# Altium PCB FOLLOWER_post_autoroute.PcbDoc
Units mm, origin at the board's own origin, x right, y up, seen from the top; angles counter-clockwise.
Board outline 51.98 x 74.98 mm, 4 copper layers (Top Layer, GND, PWR, Bottom Layer), stack 0.603 mm thick; 40 components, 49 nets, 196 pads, 39 vias.
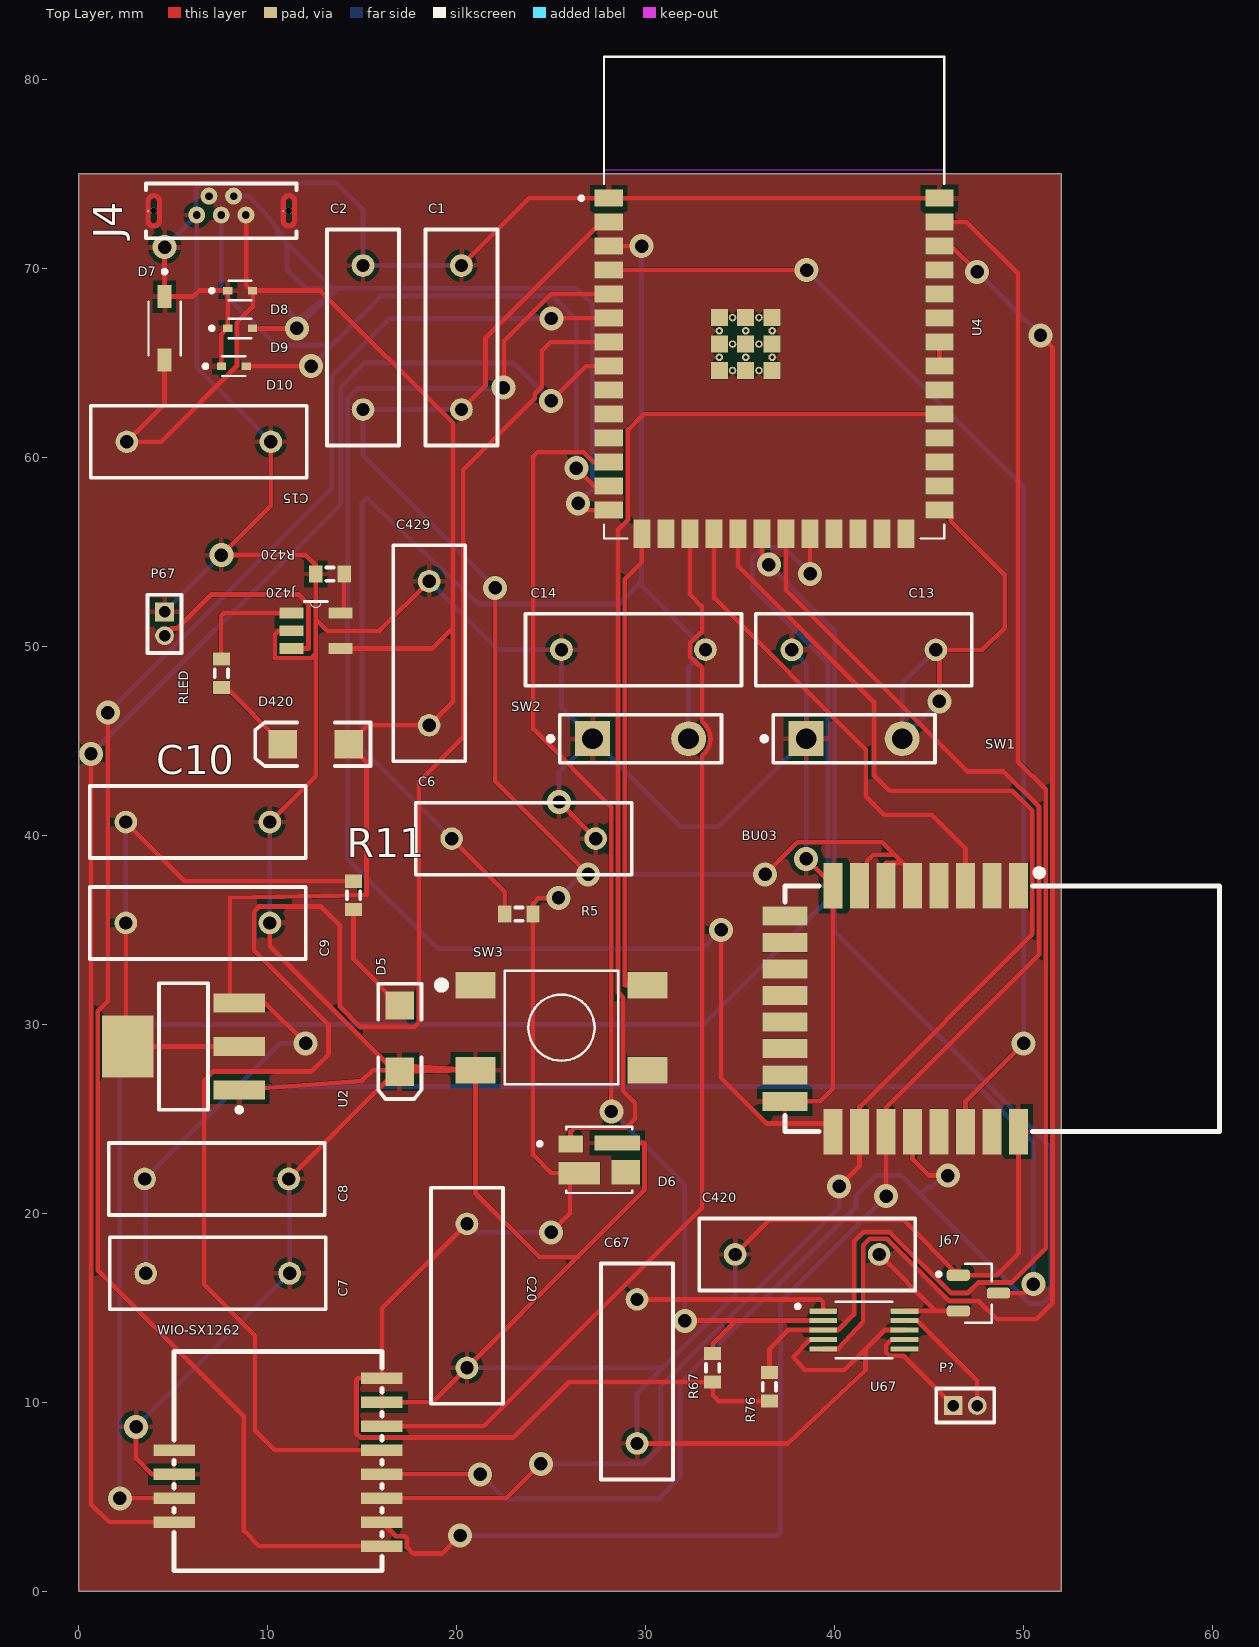
[diagram p0: Top Layer view]
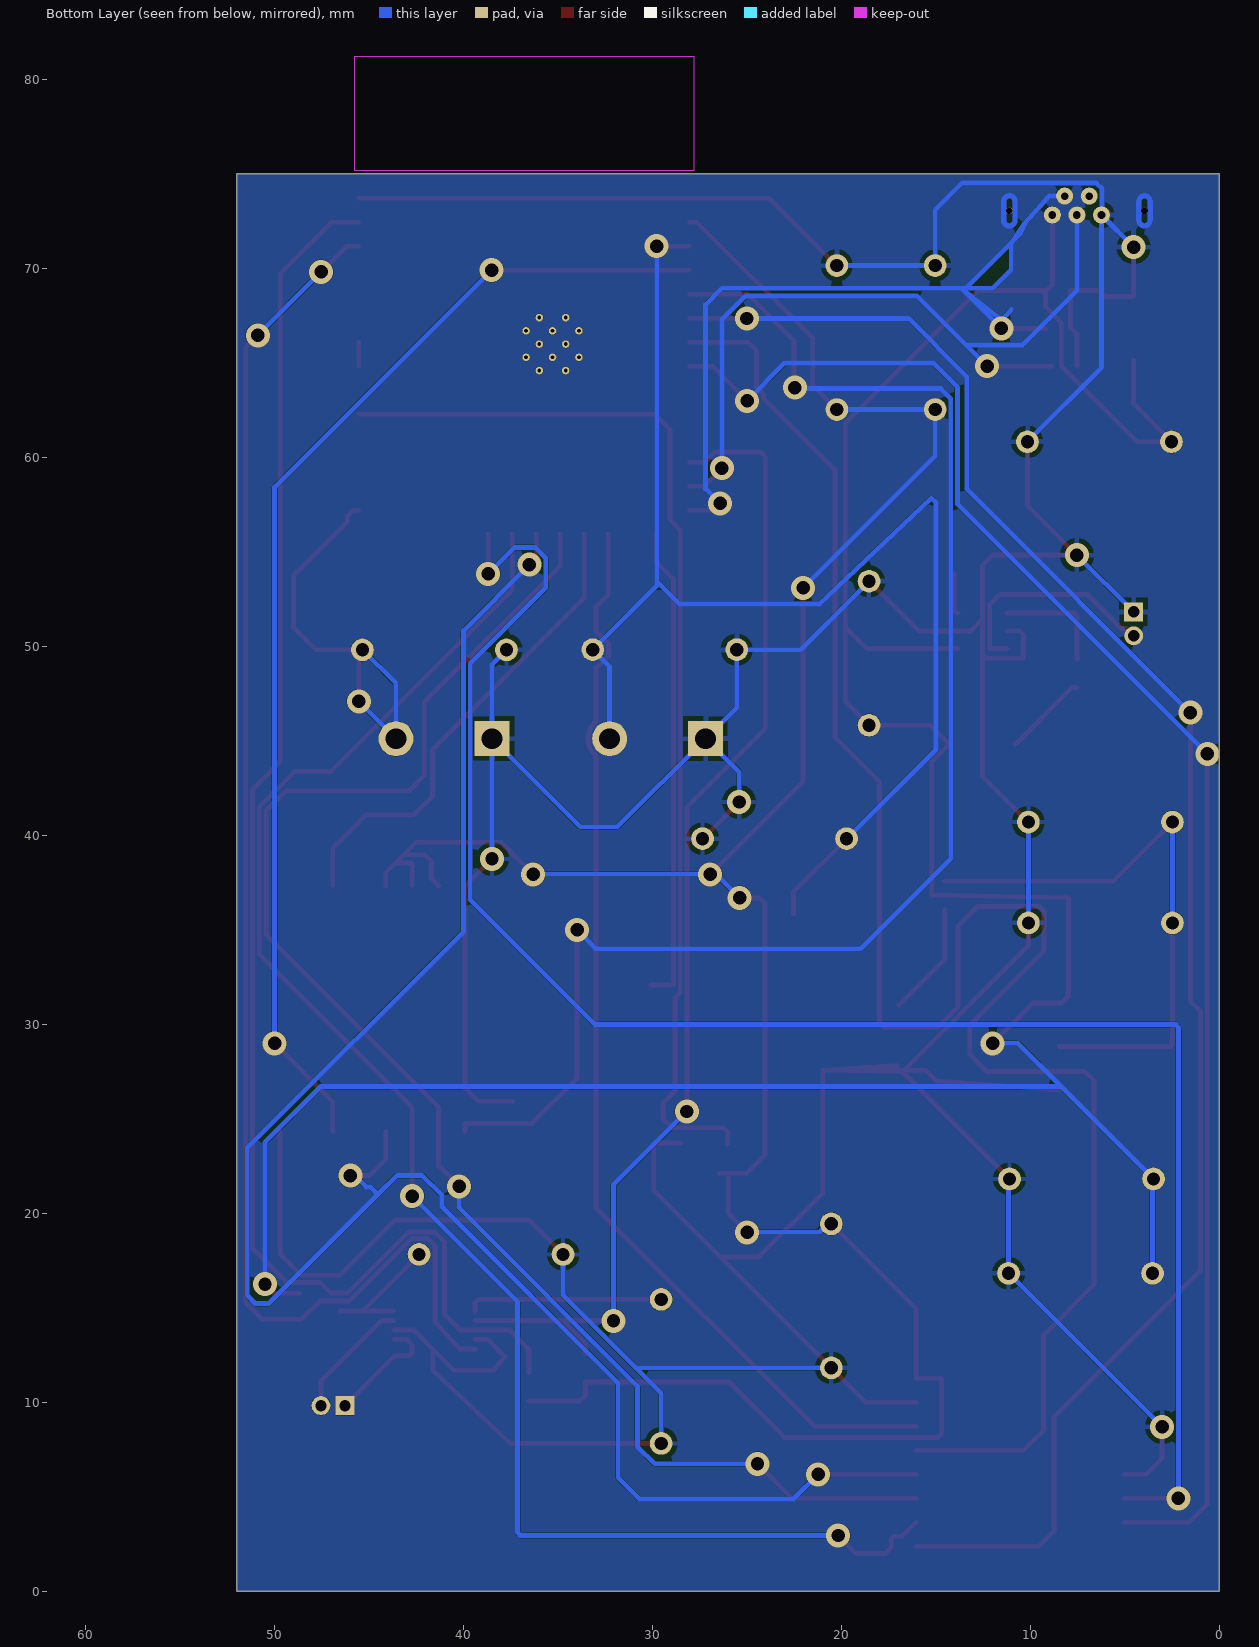
[diagram p1: Bottom Layer view, seen from below]
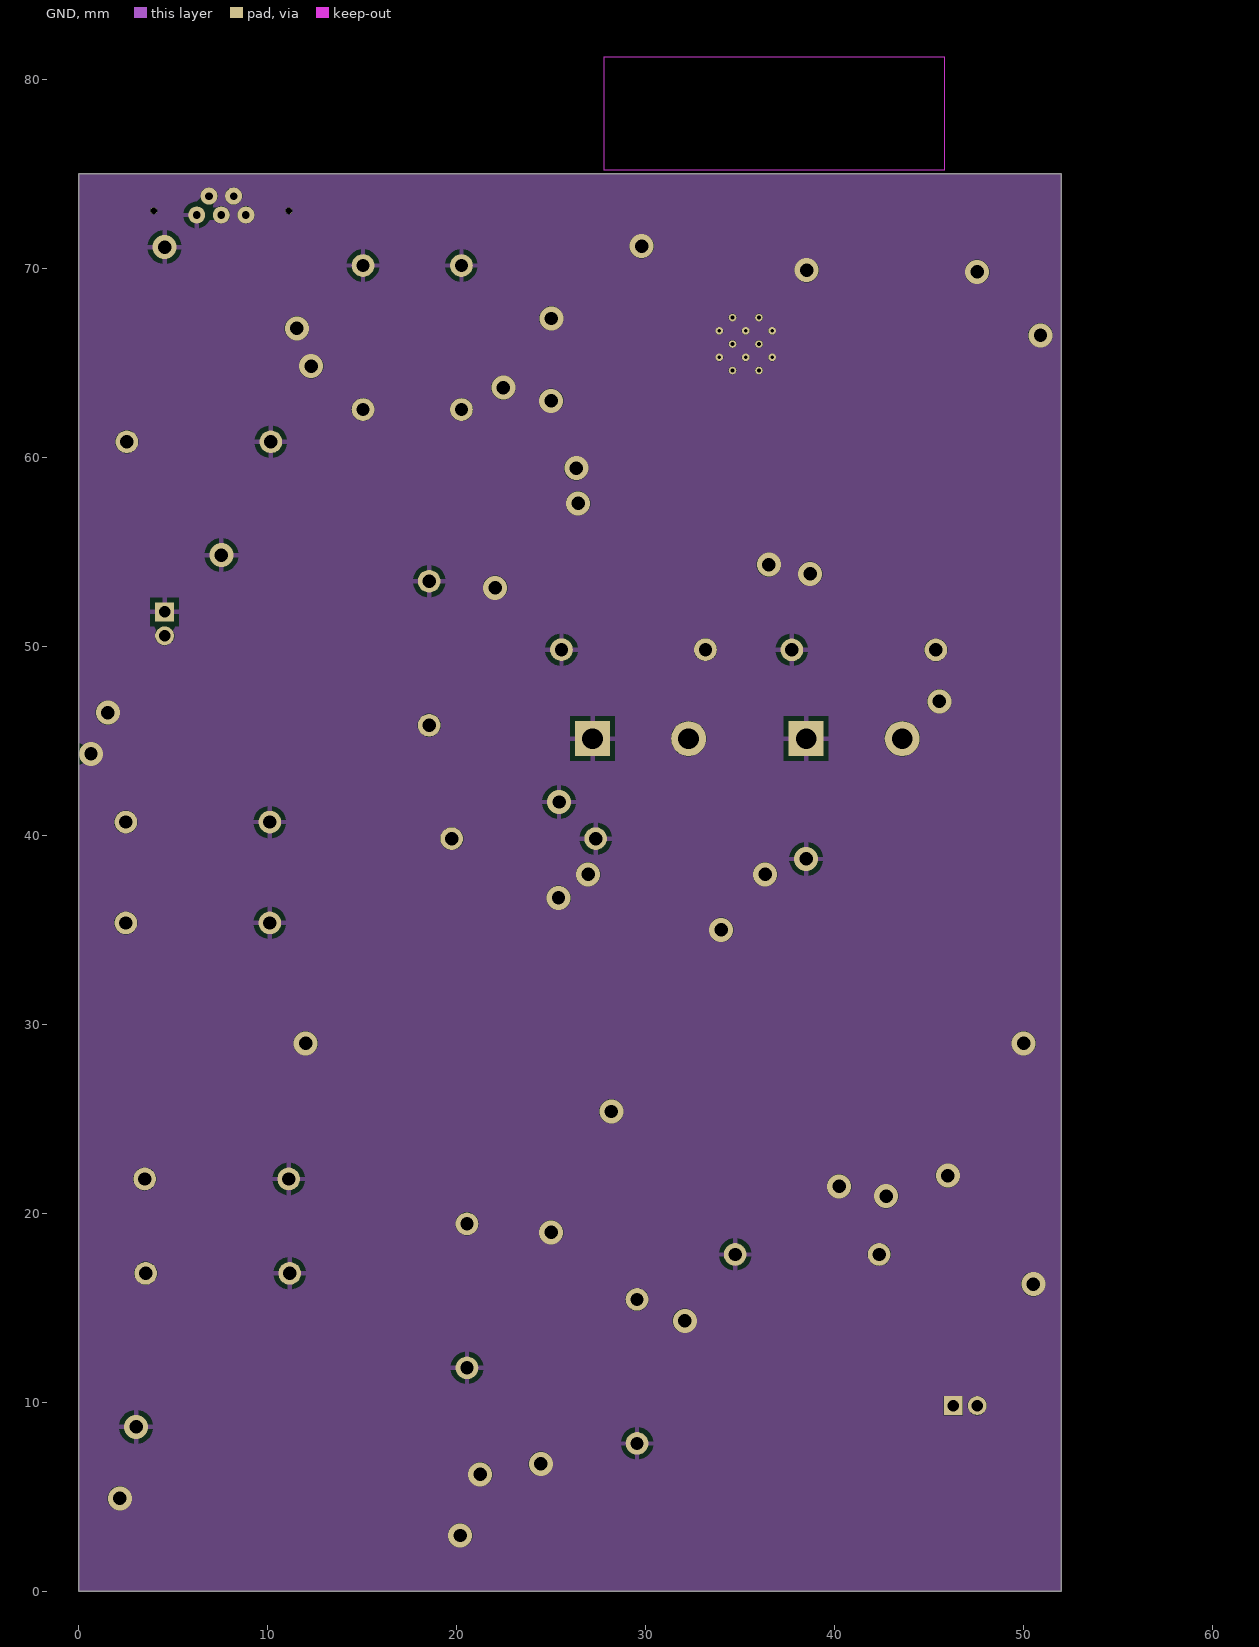
[diagram p2: GND]
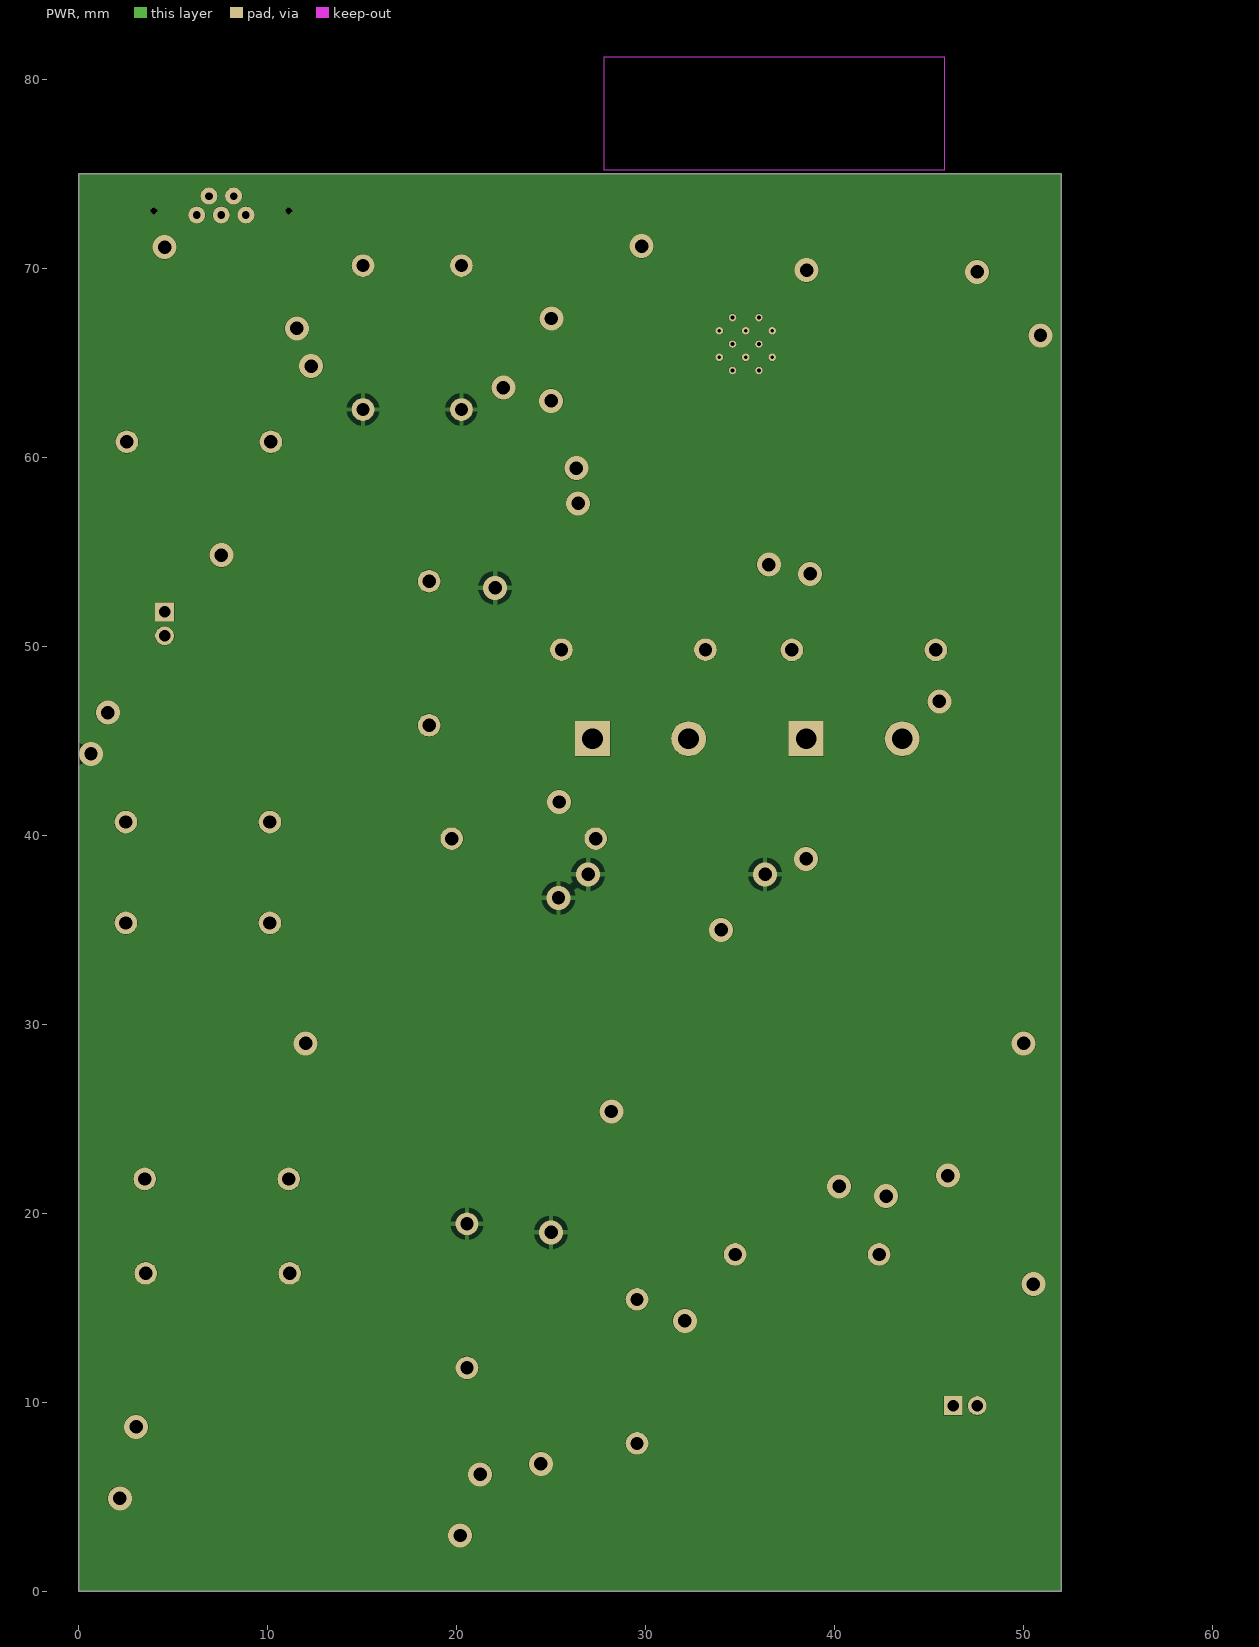
[diagram p3: PWR]

## Layer stack, top to bottom
Top Solder: solder mask 0.0102, Solder Resist, Dk 3.5
Top Layer: signal copper 0.0356
Dielectric 2: prepreg 0.0711, PP-006, Dk 4.1
GND: signal copper 0.035
Dielectric 1: dielectric 0.32, FR-4, Dk 4.8
PWR: signal copper 0.035
Dielectric 3: prepreg 0.0711, PP-006, Dk 4.1
Bottom Layer: signal copper 0.0356
Bottom Solder: solder mask 0.0102, Solder Resist, Dk 3.5

## Board outline
0.019,0.019 52,0.019 52,75 0.019,75

## Design rules (kind name [scope] priority, off if disabled: settings)
Clearance U67_rule [InComponent('U67')] p1: gap=0.05 ignorepadtopadclearanceinfootprint=FALSE
HoleToHoleClearance [All] p1: gap=0.1 allowstackedmicrovias=TRUE
MinimumSolderMaskSliver MinimumSolderMaskSliver_U67 [InComponent('U67')] p1: minsoldermaskwidth=0.01
PolygonConnect [All] p1: connectstyle=Relief reliefconductorwidth=0.254 reliefentries=4 polygonreliefangle="90 Angle" airgapwidth=0.254
RoutingVias [All] p1: holewidth=0.711 width=1.27 viastyle="Through Hole" minholewidth=0.711 minwidth=1.27 maxholewidth=0.711 maxwidth=1.27
SilkToSilkClearance [All] p1: silktosilkclearance=0.1
SilkToSolderMaskClearance [IsPad] p1: minsilkscreentomaskgap=0.1 clearancetoexposedcopper=TRUE
SolderMaskExpansion [All] p1: expansion=0 istentingtop=FALSE
SupplyNets "Schematic Supply Nets_1" [InNet('+5')] p1: voltage=0.000
SupplyNets "Schematic Supply Nets" [InNet('GND')] p2: voltage=0.000
Width [All] p1: maxlimit=0.254 minlimit=0.254 preferedwidth=0.254
26 further rules are at their usual default settings.

## Classes and differential pairs
component class FOLLOWER_DEVICE: BU03 C20 C67 C429 D420 J67 J420 P67 P? R67 R76 R420 RLED SW3 U67 WIO-SX1262
component class ESP32S3WROOM1: C1 C2 C6 C7 C8 C9 C10 C13 C14 C15 D5 D6 D7 D8 D9 D10 J4 R5 R11 SW1 SW2 U2 U4

## Components (designator, comment, footprint, x,y, rotation, side; value= is the part's Value field where it differs from the comment)
BU03 "6.4895GHz；7.9872GHz" WIRELM-SMD_BU03 43.55,30.83 r270 top
C1 "Cap" RAD-0.3 20.256,66.346 r270 top value=10uF
C2 "Cap" RAD-0.3 15.049,66.346 r270 top value=1uF
C6 "Cap" RAD-0.3 23.55,39.83 r180 top value=1uF
C7 "Cap" RAD-0.3 7.36,16.83 r180 top value=10uF
C8 "Cap" RAD-0.3 7.308,21.824 r180 top value=.1uF
C9 "Cap" RAD-0.3 6.308,35.372 r180 top value=.1uF
C10 "Cap" RAD-0.3 6.308,40.706 r180 top value=10uF
C13 "Cap" RAD-0.3 41.548,49.82 r180 top value=.1uF
C14 "Cap" RAD-0.3 29.36,49.83 r180 top value=.1uF
C15 "Cap" RAD-0.3 6.36,60.83 r180 top value=10uF
C20 "Cap" RAD-0.3 20.55,15.64 r270 top value=1uF
C67 "Cap" RAD-0.3 29.55,11.64 r90 top value=1uF
C420 "Cap" RAD-0.3 38.55,17.83 r180 top value=1uF
C429 "Cap" RAD-0.3 18.55,49.64 r270 top value=4.7uF
D5 "LED2" 3.2X1.6X1.1 17,29.25 r270 top
D6 "SK6812MINI-012" LED_SK6812MINI-012 27.55,22.83 r0 top
D7 "1N5819HW-7-F" SOD3715X145N 4.55,66.83 r270 top
D8 "LESD5D5.0CT1G" TVS_LESD5D5.0CT1G 8.55,68.83 r0 top
D9 "LESD5D5.0CT1G" TVS_LESD5D5.0CT1G 8.55,66.83 r0 top
D10 "LESD5D5.0CT1G" TVS_LESD5D5.0CT1G 8.21,64.83 r0 top
D420 "LED2" 3.2X1.6X1.1 12.55,44.83 r180 top
J4 "USB3130-XX-X_REVD" GCT_USB3130-XX-X_REVD 7.55,73.05 r180 top
J67 "MCP1700T-5002E/TT" SOT95P237X112-3N 47.61,15.78 r0 top
J420 "MCP73831T-2ACI/OT" SOT95P280X145-5N 12.55,50.83 r0 top
P67 "Header 2" MHDR1X2 4.55,51.83 r270 top
P? "Header 2" MHDR1X2 46.28,9.83 r0 top
R5 "Res3" J1-0603 23.3,35.83 r0 top value=10K
R11 "Res3" J1-0603 14.55,36.83 r90 top value=5.1K
R67 "Res3" J1-0603 33.55,11.83 r270 top value=4.7K
R76 "Res3" J1-0603 36.55,10.83 r270 top value=4.7K
R420 "Res3" J1-0603 13.3,53.83 r0 top value=10K
RLED "Res3" J1-0603 7.55,48.58 r90 top value=1K
SW1 "NTC013-AT1J-A160T" SPST-2 41.04,45.121 r0 top
SW2 "NTC013-AT1J-A160T" SPST-2 29.737,45.121 r0 top
SW3 "4-1437565-9" TE_4-1437565-9 25.55,29.83 r0 top
U2 "SGM2212-3.3XKC3G/TR" SOT223_M 5.55,28.83 r180 top
U4 "ESP32-S3-WROOM-1" XCVR_ESP32S3WROOM1N8R8 36.8,68.46 r0 top
U67 "DRV2605LDGST" SOP50P490X110-10N 41.55,13.83 r0 top
WIO-SX1262 "WIO-SX1262" WIRELM-SMD_WIO-SX1262 10.55,6.83 r90 top

## Footprints (in the part's own frame and the unit in brackets; to place one, negate y for a bottom-side part, rotate by r counter-clockwise, add the part's x,y. Pads: shape width x height; smd on the part's side, far side on the other; paste and mask are expansions set on the pad)
3.2X1.6X1.1 [mm] "SMT LED; 2 Flat Leads"
  rect 1.5x1.5 smd: 1(-1.75,0) 2(1.75,0)
  silkscreen extent -2.9,-1.15 3.2,1.15
GCT_USB3130-XX-X_REVD [mm]
  round 0.9 hole 0.4: 1(-1.3,0.22) 2(-0.65,-0.78) 3(0,0.22) 4(0.65,-0.78) 5(1.3,0.22)
  rect 0.1x0.1 smd paste-1 mask+0: 6(-3.275,0) 7(3.875,0)
  round 0.35 hole 0.35 unplated: ""(-3.575,0) ""(3.575,0)
  Top Layer region: -3.553,0.924 -3.531,0.923 -3.509,0.92 -3.487,0.916 -3.465,0.911 -3.444,0.904 -3.423,0.897 -3.402,0.888 -3.382,0.879 -3.362,0.868 -3.344,0.856 -3.325,0.844 -3.308,0.83 -3.291,0.816 -3.274,0.801 -3.259,0.784 -3.245,0.767 -3.231,0.75 -3.219,0.731 -3.207,0.712 -3.196,0.693 -3.187,0.673 -3.178,0.652 -3.171,0.631 -3.164,0.61 -3.159,0.588 -3.155,0.566 -3.152,0.544 -3.151,0.522 -3.15,0.5 -3.15,0 -3.4,0 -3.4,0.5 -3.4,0.509 -3.401,0.518 -3.402,0.527 -3.404,0.536 -3.406,0.545 -3.409,0.554 -3.412,0.563 -3.415,0.571 -3.419,0.579 -3.423,0.587 -3.428,0.595 -3.433,0.603 -3.439,0.61 -3.445,0.617 -3.451,0.624 -3.458,0.63 -3.465,0.636 -3.472,0.642 -3.48,0.647 -3.487,0.652 -3.496,0.656 -3.504,0.66 -3.512,0.663 -3.521,0.666 -3.53,0.669 -3.539,0.671 -3.548,0.673 -3.557,0.674 -3.566,0.675 -3.584,0.675 -3.593,0.674 -3.602,0.673 -3.611,0.671 -3.62,0.669 -3.629,0.666 -3.638,0.663 -3.646,0.66 -3.654,0.656 -3.663,0.652 -3.67,0.647 -3.678,0.642 -3.685,0.636 -3.692,0.63 -3.699,0.624 -3.705,0.617 -3.711,0.61 -3.717,0.603 -3.722,0.595 -3.727,0.588 -3.731,0.579 -3.735,0.571 -3.738,0.563 -3.741,0.554 -3.744,0.545 -3.746,0.536 -3.748,0.527 -3.749,0.518 -3.75,0.509 -3.75,0.5 -3.75,0 -4,0 -4,0.5 -3.999,0.522 -3.998,0.544 -3.995,0.566 -3.991,0.588 -3.986,0.61 -3.979,0.631 -3.972,0.652 -3.963,0.673 -3.954,0.693 -3.943,0.713 -3.931,0.731 -3.919,0.75 -3.905,0.767 -3.891,0.784 -3.876,0.801 -3.859,0.816 -3.842,0.83 -3.825,0.844 -3.806,0.856 -3.788,0.868 -3.768,0.879 -3.748,0.888 -3.727,0.897 -3.706,0.904 -3.685,0.911 -3.663,0.916 -3.641,0.92 -3.619,0.923 -3.597,0.924 -3.575,0.925
  Top Layer region: -3.15,-0.5 -3.151,-0.522 -3.152,-0.544 -3.155,-0.566 -3.159,-0.588 -3.164,-0.61 -3.171,-0.631 -3.178,-0.652 -3.187,-0.673 -3.196,-0.693 -3.207,-0.712 -3.219,-0.731 -3.231,-0.75 -3.245,-0.767 -3.259,-0.784 -3.274,-0.801 -3.291,-0.816 -3.308,-0.83 -3.325,-0.844 -3.344,-0.856 -3.362,-0.868 -3.382,-0.879 -3.402,-0.888 -3.423,-0.897 -3.444,-0.904 -3.465,-0.911 -3.487,-0.916 -3.509,-0.92 -3.531,-0.923 -3.553,-0.924 -3.575,-0.925 -3.597,-0.924 -3.619,-0.923 -3.641,-0.92 -3.663,-0.916 -3.685,-0.911 -3.706,-0.904 -3.727,-0.897 -3.748,-0.888 -3.768,-0.879 -3.788,-0.868 -3.806,-0.856 -3.825,-0.844 -3.842,-0.83 -3.859,-0.816 -3.876,-0.801 -3.891,-0.784 -3.905,-0.767 -3.919,-0.75 -3.931,-0.731 -3.943,-0.713 -3.954,-0.693 -3.963,-0.673 -3.972,-0.652 -3.979,-0.631 -3.986,-0.61 -3.991,-0.588 -3.995,-0.566 -3.998,-0.544 -3.999,-0.522 -4,-0.5 -4,0 -3.75,0 -3.75,-0.5 -3.75,-0.509 -3.749,-0.518 -3.748,-0.527 -3.746,-0.536 -3.744,-0.545 -3.741,-0.554 -3.738,-0.563 -3.735,-0.571 -3.731,-0.579 -3.727,-0.588 -3.722,-0.595 -3.717,-0.603 -3.711,-0.61 -3.705,-0.617 -3.699,-0.624 -3.692,-0.63 -3.685,-0.636 -3.678,-0.642 -3.67,-0.647 -3.663,-0.652 -3.654,-0.656 -3.646,-0.66 -3.638,-0.663 -3.629,-0.666 -3.62,-0.669 -3.611,-0.671 -3.602,-0.673 -3.593,-0.674 -3.584,-0.675 -3.566,-0.675 -3.557,-0.674 -3.548,-0.673 -3.539,-0.671 -3.53,-0.669 -3.521,-0.666 -3.512,-0.663 -3.504,-0.66 -3.496,-0.656 -3.487,-0.652 -3.48,-0.647 -3.472,-0.642 -3.465,-0.636 -3.458,-0.63 -3.451,-0.624 -3.445,-0.617 -3.439,-0.61 -3.433,-0.603 -3.428,-0.595 -3.423,-0.587 -3.419,-0.579 -3.415,-0.571 -3.412,-0.563 -3.409,-0.554 -3.406,-0.545 -3.404,-0.536 -3.402,-0.527 -3.401,-0.518 -3.4,-0.509 -3.4,-0.5 -3.4,0 -3.15,0
  Top Layer region: 3.597,0.924 3.619,0.923 3.641,0.92 3.663,0.916 3.685,0.911 3.706,0.904 3.727,0.897 3.748,0.888 3.768,0.879 3.788,0.868 3.806,0.856 3.825,0.844 3.842,0.83 3.859,0.816 3.876,0.801 3.891,0.784 3.905,0.767 3.919,0.75 3.931,0.731 3.943,0.713 3.954,0.693 3.963,0.673 3.972,0.652 3.979,0.631 3.986,0.61 3.991,0.588 3.995,0.566 3.998,0.544 3.999,0.522 4,0.5 4,0 3.75,0 3.75,0.5 3.75,0.509 3.749,0.518 3.748,0.527 3.746,0.536 3.744,0.545 3.741,0.554 3.738,0.563 3.735,0.571 3.731,0.579 3.727,0.588 3.722,0.595 3.717,0.603 3.711,0.61 3.705,0.617 3.699,0.624 3.692,0.63 3.685,0.636 3.678,0.642 3.67,0.647 3.663,0.652 3.654,0.656 3.646,0.66 3.638,0.663 3.629,0.666 3.62,0.669 3.611,0.671 3.602,0.673 3.593,0.674 3.584,0.675 3.566,0.675 3.557,0.674 3.548,0.673 3.539,0.671 3.53,0.669 3.521,0.666 3.512,0.663 3.504,0.66 3.496,0.656 3.487,0.652 3.48,0.647 3.472,0.642 3.465,0.636 3.458,0.63 3.451,0.624 3.445,0.617 3.439,0.61 3.433,0.603 3.428,0.595 3.423,0.587 3.419,0.579 3.415,0.571 3.412,0.563 3.409,0.554 3.406,0.545 3.404,0.536 3.402,0.527 3.401,0.518 3.4,0.509 3.4,0.5 3.4,0 3.15,0 3.15,0.5 3.151,0.522 3.152,0.544 3.155,0.566 3.159,0.588 3.164,0.61 3.171,0.631 3.178,0.652 3.187,0.673 3.196,0.693 3.207,0.712 3.219,0.731 3.231,0.75 3.245,0.767 3.259,0.784 3.274,0.801 3.291,0.816 3.308,0.83 3.325,0.844 3.344,0.856 3.362,0.868 3.382,0.879 3.402,0.888 3.423,0.897 3.444,0.904 3.465,0.911 3.487,0.916 3.509,0.92 3.531,0.923 3.553,0.924 3.575,0.925
  Top Layer region: 4,-0.5 3.999,-0.522 3.998,-0.544 3.995,-0.566 3.991,-0.588 3.986,-0.61 3.979,-0.631 3.972,-0.652 3.963,-0.673 3.954,-0.693 3.943,-0.713 3.931,-0.731 3.919,-0.75 3.905,-0.767 3.891,-0.784 3.876,-0.801 3.859,-0.816 3.842,-0.83 3.825,-0.844 3.806,-0.856 3.788,-0.868 3.768,-0.879 3.748,-0.888 3.727,-0.897 3.706,-0.904 3.685,-0.911 3.663,-0.916 3.641,-0.92 3.619,-0.923 3.597,-0.924 3.575,-0.925 3.553,-0.924 3.531,-0.923 3.509,-0.92 3.487,-0.916 3.465,-0.911 3.444,-0.904 3.423,-0.897 3.402,-0.888 3.382,-0.879 3.362,-0.868 3.344,-0.856 3.325,-0.844 3.308,-0.83 3.291,-0.816 3.274,-0.801 3.259,-0.784 3.245,-0.767 3.231,-0.75 3.219,-0.731 3.207,-0.712 3.196,-0.693 3.187,-0.673 3.178,-0.652 3.171,-0.631 3.164,-0.61 3.159,-0.588 3.155,-0.566 3.152,-0.544 3.151,-0.522 3.15,-0.5 3.15,0 3.4,0 3.4,-0.5 3.4,-0.509 3.401,-0.518 3.402,-0.527 3.404,-0.536 3.406,-0.545 3.409,-0.554 3.412,-0.563 3.415,-0.571 3.419,-0.579 3.423,-0.587 3.428,-0.595 3.433,-0.603 3.439,-0.61 3.445,-0.617 3.451,-0.624 3.458,-0.63 3.465,-0.636 3.472,-0.642 3.48,-0.647 3.487,-0.652 3.496,-0.656 3.504,-0.66 3.512,-0.663 3.521,-0.666 3.53,-0.669 3.539,-0.671 3.548,-0.673 3.557,-0.674 3.566,-0.675 3.584,-0.675 3.593,-0.674 3.602,-0.673 3.611,-0.671 3.62,-0.669 3.629,-0.666 3.638,-0.663 3.646,-0.66 3.654,-0.656 3.663,-0.652 3.67,-0.647 3.678,-0.642 3.685,-0.636 3.692,-0.63 3.699,-0.624 3.705,-0.617 3.711,-0.61 3.717,-0.603 3.722,-0.595 3.727,-0.588 3.731,-0.579 3.735,-0.571 3.738,-0.563 3.741,-0.554 3.744,-0.545 3.746,-0.536 3.748,-0.527 3.749,-0.518 3.75,-0.509 3.75,-0.5 3.75,0 4,0
  Bottom Layer region: -3.553,0.924 -3.531,0.923 -3.509,0.92 -3.487,0.916 -3.465,0.911 -3.444,0.904 -3.423,0.897 -3.402,0.888 -3.382,0.879 -3.362,0.868 -3.344,0.856 -3.325,0.844 -3.308,0.83 -3.291,0.816 -3.274,0.801 -3.259,0.784 -3.245,0.767 -3.231,0.75 -3.219,0.731 -3.207,0.712 -3.196,0.693 -3.187,0.673 -3.178,0.652 -3.171,0.631 -3.164,0.61 -3.159,0.588 -3.155,0.566 -3.152,0.544 -3.151,0.522 -3.15,0.5 -3.15,0 -3.4,0 -3.4,0.5 -3.4,0.509 -3.401,0.518 -3.402,0.527 -3.404,0.536 -3.406,0.545 -3.409,0.554 -3.412,0.563 -3.415,0.571 -3.419,0.579 -3.423,0.587 -3.428,0.595 -3.433,0.603 -3.439,0.61 -3.445,0.617 -3.451,0.624 -3.458,0.63 -3.465,0.636 -3.472,0.642 -3.48,0.647 -3.487,0.652 -3.496,0.656 -3.504,0.66 -3.512,0.663 -3.521,0.666 -3.53,0.669 -3.539,0.671 -3.548,0.673 -3.557,0.674 -3.566,0.675 -3.584,0.675 -3.593,0.674 -3.602,0.673 -3.611,0.671 -3.62,0.669 -3.629,0.666 -3.638,0.663 -3.646,0.66 -3.654,0.656 -3.663,0.652 -3.67,0.647 -3.678,0.642 -3.685,0.636 -3.692,0.63 -3.699,0.624 -3.705,0.617 -3.711,0.61 -3.717,0.603 -3.722,0.595 -3.727,0.588 -3.731,0.579 -3.735,0.571 -3.738,0.563 -3.741,0.554 -3.744,0.545 -3.746,0.536 -3.748,0.527 -3.749,0.518 -3.75,0.509 -3.75,0.5 -3.75,0 -4,0 -4,0.5 -3.999,0.522 -3.998,0.544 -3.995,0.566 -3.991,0.588 -3.986,0.61 -3.979,0.631 -3.972,0.652 -3.963,0.673 -3.954,0.693 -3.943,0.713 -3.931,0.731 -3.919,0.75 -3.905,0.767 -3.891,0.784 -3.876,0.801 -3.859,0.816 -3.842,0.83 -3.825,0.844 -3.806,0.856 -3.788,0.868 -3.768,0.879 -3.748,0.888 -3.727,0.897 -3.706,0.904 -3.685,0.911 -3.663,0.916 -3.641,0.92 -3.619,0.923 -3.597,0.924 -3.575,0.925
  Bottom Layer region: -3.15,-0.5 -3.151,-0.522 -3.152,-0.544 -3.155,-0.566 -3.159,-0.588 -3.164,-0.61 -3.171,-0.631 -3.178,-0.652 -3.187,-0.673 -3.196,-0.693 -3.207,-0.712 -3.219,-0.731 -3.231,-0.75 -3.245,-0.767 -3.259,-0.784 -3.274,-0.801 -3.291,-0.816 -3.308,-0.83 -3.325,-0.844 -3.344,-0.856 -3.362,-0.868 -3.382,-0.879 -3.402,-0.888 -3.423,-0.897 -3.444,-0.904 -3.465,-0.911 -3.487,-0.916 -3.509,-0.92 -3.531,-0.923 -3.553,-0.924 -3.575,-0.925 -3.597,-0.924 -3.619,-0.923 -3.641,-0.92 -3.663,-0.916 -3.685,-0.911 -3.706,-0.904 -3.727,-0.897 -3.748,-0.888 -3.768,-0.879 -3.788,-0.868 -3.806,-0.856 -3.825,-0.844 -3.842,-0.83 -3.859,-0.816 -3.876,-0.801 -3.891,-0.784 -3.905,-0.767 -3.919,-0.75 -3.931,-0.731 -3.943,-0.713 -3.954,-0.693 -3.963,-0.673 -3.972,-0.652 -3.979,-0.631 -3.986,-0.61 -3.991,-0.588 -3.995,-0.566 -3.998,-0.544 -3.999,-0.522 -4,-0.5 -4,0 -3.75,0 -3.75,-0.5 -3.75,-0.509 -3.749,-0.518 -3.748,-0.527 -3.746,-0.536 -3.744,-0.545 -3.741,-0.554 -3.738,-0.563 -3.735,-0.571 -3.731,-0.579 -3.727,-0.588 -3.722,-0.595 -3.717,-0.603 -3.711,-0.61 -3.705,-0.617 -3.699,-0.624 -3.692,-0.63 -3.685,-0.636 -3.678,-0.642 -3.67,-0.647 -3.663,-0.652 -3.654,-0.656 -3.646,-0.66 -3.638,-0.663 -3.629,-0.666 -3.62,-0.669 -3.611,-0.671 -3.602,-0.673 -3.593,-0.674 -3.584,-0.675 -3.566,-0.675 -3.557,-0.674 -3.548,-0.673 -3.539,-0.671 -3.53,-0.669 -3.521,-0.666 -3.512,-0.663 -3.504,-0.66 -3.496,-0.656 -3.487,-0.652 -3.48,-0.647 -3.472,-0.642 -3.465,-0.636 -3.458,-0.63 -3.451,-0.624 -3.445,-0.617 -3.439,-0.61 -3.433,-0.603 -3.428,-0.595 -3.423,-0.587 -3.419,-0.579 -3.415,-0.571 -3.412,-0.563 -3.409,-0.554 -3.406,-0.545 -3.404,-0.536 -3.402,-0.527 -3.401,-0.518 -3.4,-0.509 -3.4,-0.5 -3.4,0 -3.15,0
  Bottom Layer region: 3.597,0.924 3.619,0.923 3.641,0.92 3.663,0.916 3.685,0.911 3.706,0.904 3.727,0.897 3.748,0.888 3.768,0.879 3.788,0.868 3.806,0.856 3.825,0.844 3.842,0.83 3.859,0.816 3.876,0.801 3.891,0.784 3.905,0.767 3.919,0.75 3.931,0.731 3.943,0.713 3.954,0.693 3.963,0.673 3.972,0.652 3.979,0.631 3.986,0.61 3.991,0.588 3.995,0.566 3.998,0.544 3.999,0.522 4,0.5 4,0 3.75,0 3.75,0.5 3.75,0.509 3.749,0.518 3.748,0.527 3.746,0.536 3.744,0.545 3.741,0.554 3.738,0.563 3.735,0.571 3.731,0.579 3.727,0.588 3.722,0.595 3.717,0.603 3.711,0.61 3.705,0.617 3.699,0.624 3.692,0.63 3.685,0.636 3.678,0.642 3.67,0.647 3.663,0.652 3.654,0.656 3.646,0.66 3.638,0.663 3.629,0.666 3.62,0.669 3.611,0.671 3.602,0.673 3.593,0.674 3.584,0.675 3.566,0.675 3.557,0.674 3.548,0.673 3.539,0.671 3.53,0.669 3.521,0.666 3.512,0.663 3.504,0.66 3.496,0.656 3.487,0.652 3.48,0.647 3.472,0.642 3.465,0.636 3.458,0.63 3.451,0.624 3.445,0.617 3.439,0.61 3.433,0.603 3.428,0.595 3.423,0.587 3.419,0.579 3.415,0.571 3.412,0.563 3.409,0.554 3.406,0.545 3.404,0.536 3.402,0.527 3.401,0.518 3.4,0.509 3.4,0.5 3.4,0 3.15,0 3.15,0.5 3.151,0.522 3.152,0.544 3.155,0.566 3.159,0.588 3.164,0.61 3.171,0.631 3.178,0.652 3.187,0.673 3.196,0.693 3.207,0.712 3.219,0.731 3.231,0.75 3.245,0.767 3.259,0.784 3.274,0.801 3.291,0.816 3.308,0.83 3.325,0.844 3.344,0.856 3.362,0.868 3.382,0.879 3.402,0.888 3.423,0.897 3.444,0.904 3.465,0.911 3.487,0.916 3.509,0.92 3.531,0.923 3.553,0.924 3.575,0.925
  Bottom Layer region: 4,-0.5 3.999,-0.522 3.998,-0.544 3.995,-0.566 3.991,-0.588 3.986,-0.61 3.979,-0.631 3.972,-0.652 3.963,-0.673 3.954,-0.693 3.943,-0.713 3.931,-0.731 3.919,-0.75 3.905,-0.767 3.891,-0.784 3.876,-0.801 3.859,-0.816 3.842,-0.83 3.825,-0.844 3.806,-0.856 3.788,-0.868 3.768,-0.879 3.748,-0.888 3.727,-0.897 3.706,-0.904 3.685,-0.911 3.663,-0.916 3.641,-0.92 3.619,-0.923 3.597,-0.924 3.575,-0.925 3.553,-0.924 3.531,-0.923 3.509,-0.92 3.487,-0.916 3.465,-0.911 3.444,-0.904 3.423,-0.897 3.402,-0.888 3.382,-0.879 3.362,-0.868 3.344,-0.856 3.325,-0.844 3.308,-0.83 3.291,-0.816 3.274,-0.801 3.259,-0.784 3.245,-0.767 3.231,-0.75 3.219,-0.731 3.207,-0.712 3.196,-0.693 3.187,-0.673 3.178,-0.652 3.171,-0.631 3.164,-0.61 3.159,-0.588 3.155,-0.566 3.152,-0.544 3.151,-0.522 3.15,-0.5 3.15,0 3.4,0 3.4,-0.5 3.4,-0.509 3.401,-0.518 3.402,-0.527 3.404,-0.536 3.406,-0.545 3.409,-0.554 3.412,-0.563 3.415,-0.571 3.419,-0.579 3.423,-0.587 3.428,-0.595 3.433,-0.603 3.439,-0.61 3.445,-0.617 3.451,-0.624 3.458,-0.63 3.465,-0.636 3.472,-0.642 3.48,-0.647 3.487,-0.652 3.496,-0.656 3.504,-0.66 3.512,-0.663 3.521,-0.666 3.53,-0.669 3.539,-0.671 3.548,-0.673 3.557,-0.674 3.566,-0.675 3.584,-0.675 3.593,-0.674 3.602,-0.673 3.611,-0.671 3.62,-0.669 3.629,-0.666 3.638,-0.663 3.646,-0.66 3.654,-0.656 3.663,-0.652 3.67,-0.647 3.678,-0.642 3.685,-0.636 3.692,-0.63 3.699,-0.624 3.705,-0.617 3.711,-0.61 3.717,-0.603 3.722,-0.595 3.727,-0.588 3.731,-0.579 3.735,-0.571 3.738,-0.563 3.741,-0.554 3.744,-0.545 3.746,-0.536 3.748,-0.527 3.749,-0.518 3.75,-0.509 3.75,-0.5 3.75,0 4,0
  silkscreen extent -3.98,-1.45 3.98,1.45
J1-0603 [mm] "Chip Resistor, Body 1.6x0.8mm, IPC High Density"
  rect 0.7x0.9 smd: 1(-0.75,0) 2(0.75,0)
  silkscreen extent -0.2,-0.35 0.2,0.35, body extent -0.85,-0.48 0.85,0.48, height 0.9
LED_SK6812MINI-012 [mm]
  rect 1.3x0.9 smd: 1(-1.5,0.85)
  rect 2.2x1.2 smd: 2(-1.05,-0.7)
  rect 1.5x1.3 smd: 3(1.4,-0.65)
  rect 2.4x0.8 smd: 4(0.95,0.9)
  silkscreen extent -3.25,-1.75 1.75,1.75, body extent -1.85,-1.75 1.85,1.75, height 1.1
MHDR1X2 [mm] "Connector; Header; 2 Position"
  rect 1x1 hole 0.6: 1(0,0)
  round 1 hole 0.6: 2(1.27,0)
  silkscreen extent -0.9,-0.9 2.17,0.9
RAD-0.3 [mm] "Radial Cap, Thru-Hole; 2 Leads; 0.3 in Pin Spacing"
  round 1.2 hole 0.7: 1(-3.81,0) 2(3.81,0)
  silkscreen extent -5.72,-1.91 5.71,1.9
SOD3715X145N [mm]
  rect 1.21x0.73 smd: A(1.68,0) C(-1.68,0)
  silkscreen extent -3.1,-0.85 1.43,0.85, body extent -1.83,-0.77 1.83,0.77, height 0.8
SOP50P490X110-10N [mm]
  rrect25% 1.47x0.28 smd paste+0 mask+0.102: 1(-2.15,1) 2(-2.15,0.5) 3(-2.15,0) 4(-2.15,-0.5) 5(-2.15,-1) 6(2.15,-1) 7(2.15,-0.5) 8(2.15,0) 9(2.15,0.5) 10(2.15,1)
  silkscreen extent -3.6,-1.5 1.5,1.5, body extent -2.45,-1.5 2.45,1.5, height 1.1
SOT95P237X112-3N [mm]
  rrect50% 1.23x0.59 smd: 1(-1.06,0.95) 2(-1.06,-0.95) 3(1.06,0)
  silkscreen extent -2.2,-1.56 0.7,1.56, body extent -1.18,-1.45 1.18,1.45, height 1.12
SOT95P280X145-5N [mil]
  rect 50x22 smd: 1(-51,37) 2(-51,0) 3(-51,-37) 4(51,-37) 5(51,37)
  silkscreen extent -24,49 24,61, body extent -53,-57 53,57, height 57
SOT223_M [mm] "SOT223, 4-Leads, Body 6.5x3.5mm, Pitch 2.3mm, Lead Span 7mm, IPC Low Density"
  rect 2.7x1 smd: 1(-2.95,2.3) 2(-2.95,0) 3(-2.95,-2.3)
  rect 2.7x3.3 smd: 4(2.95,0)
  silkscreen extent -3.08,-3.35 1.3,3.47, body extent -1.85,-3.35 1.85,3.35, height 1.7
SPST-2 [mm] "Switch; 2 Leads"
  rect 1.85x1.85 hole 1.1: 1(-2.54,0)
  round 1.85 hole 1.1: 2(2.54,0)
  silkscreen extent -4.89,-1.27 4.28,1.27
TE_4-1437565-9 [mm]
  rect 2.1x1.4 smd: 1(-4.55,2.25) 2(4.55,2.25) 3(-4.55,-2.25) 4(4.55,-2.25)
  silkscreen extent -6.55,-3 3,3, body extent -5,-3 5,3, height 7.26
TVS_LESD5D5.0CT1G [mm]
  rect 0.48x0.4 smd: 1(-0.66,0) 2(0.66,0)
  silkscreen extent -1.6,-0.52 0.6,0.52, body extent -0.8,-0.4 0.8,0.4, height 0.7
WIRELM-SMD_BU03 [mm]
  rect 2.4x1 smd paste+0 mask+0.05: 1(-6.5,6.175) 2(-6.5,4.775) 3(-6.5,3.375) 4(-6.5,1.975) 5(-6.5,0.575) 6(-6.5,-0.825) 7(-6.5,-2.225) 8(-6.5,-3.625) 17(6.5,-3.625) 18(6.5,-2.225) 19(6.5,-0.825) 20(6.5,0.575) 21(6.5,1.975) 22(6.5,3.375) 23(6.5,4.775) 24(6.5,6.175)
  rect 1x2.4 smd paste+0 mask+0.05: 9(-4.9,-6.175) 10(-3.5,-6.175) 11(-2.1,-6.175) 12(-0.7,-6.175) 13(0.7,-6.175) 14(2.1,-6.175) 15(3.5,-6.175) 16(4.9,-6.175)
  silkscreen extent -7.55,-6.18 6.5,16.82
WIRELM-SMD_WIO-SX1262 [mm]
  rect 0.6x2.2 smd paste+0 mask+0.051: 1(-4.445,-5.5) 2(-3.175,-5.5) 3(-1.905,-5.5) 4(-0.635,-5.5) 5(0.635,-5.5) 6(1.905,-5.5) 7(3.175,-5.5) 8(4.445,-5.5) 9(0.635,5.5) 10(-0.635,5.5) 11(-1.905,5.5) 12(-3.175,5.5)
  silkscreen extent -5.74,-5.5 5.86,5.5
XCVR_ESP32S3WROOM1N8R8 [mm]
  rect 1.5x0.9 smd: 1(-8.75,5.26) 2(-8.75,3.99) 3(-8.75,2.72) 4(-8.75,1.45) 5(-8.75,0.18) 6(-8.75,-1.09) 7(-8.75,-2.36) 8(-8.75,-3.63) 9(-8.75,-4.9) 10(-8.75,-6.17) 11(-8.75,-7.44) 12(-8.75,-8.71) 13(-8.75,-9.98) 14(-8.75,-11.25) 27(8.75,-11.25) 28(8.75,-9.98) 29(8.75,-8.71) 30(8.75,-7.44) 31(8.75,-6.17) 32(8.75,-4.9) 33(8.75,-3.63) 34(8.75,-2.36) 35(8.75,-1.09) 36(8.75,0.18) 37(8.75,1.45) 38(8.75,2.72) 39(8.75,3.99) 40(8.75,5.26)
  rect 0.9x1.5 smd: 15(-6.985,-12.5) 16(-5.715,-12.5) 17(-4.445,-12.5) 18(-3.175,-12.5) 19(-1.905,-12.5) 20(-0.635,-12.5) 21(0.635,-12.5) 22(1.905,-12.5) 23(3.175,-12.5) 24(4.445,-12.5) 25(5.715,-12.5) 26(6.985,-12.5)
  rect 0.9x0.9 smd: 41_1(-1.5,-2.46) 41_2(-2.9,-2.46) 41_3(-0.1,-2.46) 41_4(-2.9,-3.86) 41_5(-1.5,-3.86) 41_6(-0.1,-3.86) 41_7(-2.9,-1.06) 41_8(-1.5,-1.06) 41_9(-0.1,-1.06)
  round 0.4 hole 0.2 mask+0: 41_10(-1.5,-1.76) 41_11(-2.9,-1.76) 41_12(-0.1,-1.76) 41_13(-2.9,-3.16) 41_14(-1.5,-3.16) 41_15(-0.1,-3.16) 41_16(-2.2,-1.06) 41_17(-0.8,-1.06) 41_18(-2.2,-2.46) 41_19(-0.8,-2.46) 41_20(-2.2,-3.86) 41_21(-0.8,-3.86)
  Keep-Out Layer region: 9,6.75 -9,6.75 -9,12.75 9,12.75
  Keep-Out Layer region: 9,6.75 -9,6.75 -9,12.75 9,12.75
  silkscreen extent -10.3,-12.75 9,12.75, body extent -9,-12.75 9,12.75, height 3.25

## Part data
BU03: JLCPCB Part Class="Extended Part", Manufacturer=Ai-Thinker(安信可), Manufacturer Part=BU03, Contributor=lcsc, nameAlias=Value, spicePre=U, spiceSymbolName=BU03, Supplier=LCSC, Supplier Part=C42419011
C1 C2 C6 C7 C8 C9 C10 C13 C14 C15 C20 C67 C420 C429: "Capacitor", LatestRevisionDate=17-Jul-2002, LatestRevisionNote="Re-released for DXP Platform.", PackageDescription="Radial Cap, Thru-Hole; 2 Leads; 0.3 in Pin Spacing", PackageReference=RAD-0.3, Published=8-Jun-2000, Publisher="Altium Limited"
D5 D420: "Typical RED, GREEN, YELLOW, AMBER GaAs LED", LatestRevisionDate=17-Jul-2002, LatestRevisionNote="Re-released for DXP Platform.", PackageDescription="SM LED; 2 Flat Leads", PackageReference=3.2X1.6X1.1, PackageVersion=Feb-2002, Published=8-Jun-2000, Publisher="Altium Limited"
D6: "INTEGRATED LIGHT SOURCE INTELLIGENT CONTROL OF CHIP-ON-TOP SMD TYPE LED", Package=Package, Check_prices=https://www.snapeda.com/parts/SK6812MINI-012/DONGGUANG+OPSCO+OPTOELECTRONICS+CO.%252C+LTD/view-part/?ref=eda, MF="DONGGUANG OPSCO OPTOELECTRONICS CO., LTD", MP=SK6812MINI-012, SnapEDA_Link=https://www.snapeda.com/parts/SK6812MINI-012/DONGGUANG+OPSCO+OPTOELECTRONICS+CO.%252C+LTD/view-part/?ref=snap
D7: library part DIODE_S, Part Number=ES313000200000, Part Reference=D7, Part Type=Diode, PCB Footprint=SOD123
D8 D9 D10: library part DIODE_BI_DIR, Part Number=ES313200200000, Part Reference=D8, Part Type=Diode, PCB Footprint=SOD523
J4: "USB - micro B USB 2.0 Receptacle Connector 5 Position Through Hole", Package=None, Availability="In Stock", Check_prices=https://www.snapeda.com/parts/USB3130-30-A/Global+Connector+Technology/view-part/?ref=eda, MF="Global Connector Technology", MP=USB3130-30-A, Price=None, SnapEDA_Link=https://www.snapeda.com/parts/USB3130-30-A/Global+Connector+Technology/view-part/?ref=snap
J67: "MCP1700T-5002E/TT,LDOVoltage Regulator,250mA,5V +/-2%,2.3 to 6Vin,3-Pin SOT-23", Package="SOT-23 Microchip", Check_prices=https://www.snapeda.com/parts/MCP1700T-5002E/TT/Microchip/view-part/?ref=eda, MF=Microchip, MP=MCP1700T-5002E/TT, SnapEDA_Link=https://www.snapeda.com/parts/MCP1700T-5002E/TT/Microchip/view-part/?ref=snap
J420: "Charger IC Lithium Ion/Polymer SOT-23-5", Package="SOT-23 Microchip", Availability="In Stock", Check_prices=https://www.snapeda.com/parts/MCP73831T-2ACI/OT/Microchip/view-part/?ref=eda, MF=Microchip, MP=MCP73831T-2ACI/OT, Price=None, Purchase-URL=https://pricing.snapeda.com/search/part/MCP73831T-2ACI/OT/?ref=eda, SnapEDA_Link=https://www.snapeda.com/parts/MCP73831T-2ACI/OT/Microchip/view-part/?ref=snap
P67 P?: "Header, 2-Pin", LatestRevisionDate=17-Jul-2002, LatestRevisionNote="Re-released for DXP Platform.", Publisher="Altium Limited"
R5 R11 R67 R76 R420 RLED: "Resistor", LatestRevisionDate=29-May-2009, LatestRevisionNote="IPC-7351 Footprint Added.", PackageDescription="Chip Resistor", PackageReference=J1-0603, Published=8-Jun-2000, Publisher="Altium Limited"
SW1 SW2: library part SW_SP_4P, Part Number=ES511600400000, CLASS=DISCRETE, Part Type="Tact Switch", PCB Footprint=SW4-4P2X3P2X2P5-SMT, TIME=2004-11-29
  SW1: Part Reference=SW1
  SW2: Part Reference=SW2
SW3: "Alcoswitch, Switch, Tactile, 50 mA, SPST, Pushbutton, Off[On], FSM6JSMA", Contact_Current_Rating="50 mA", Package=None, Check_prices=https://www.snapeda.com/parts/FSM6JSMA/TE+Connectivity+ALCOSWITCH+Switches/view-part/?ref=eda, Configuration_Pole-Throw="Single Pole - Single Throw", EU_RoHS_Compliance=Compliant, MF="TE Connectivity", MP=FSM6JSMA, SnapEDA_Link=https://www.snapeda.com/parts/FSM6JSMA/TE+Connectivity+ALCOSWITCH+Switches/view-part/?ref=snap
U2: library part LDO1117, Part Number=ES411402000000, Part Reference=U2, Part Type="Power ICs", PCB Footprint=SOT223
U67: JLCPCB Part Class="Extended Part", Manufacturer=TI(德州仪器), Contributor=LCSC, Manufacturer Part=DRV2605LDGST, spicePre=U, spiceSymbolName=DRV2605LDGST, Supplier=LCSC, Supplier Part=C425927
WIO-SX1262: Manufacturer=null, Manufacturer Part=Wio-SX1262, Contributor=lcsc, spicePre=U, spiceSymbolName=WIO-SX1262, Supplier=LCSC, Supplier Part=C9900220371
U4: PCB Footprint=ESP32-S3-WROOM_NEW, Reference=U4

## Via types
v1: diameter 1.27, hole 0.711, Top Layer to Bottom Layer, 39 vias

## Nets (pads, with @x,y where several pads share a name; then routed paths per layer and width w, separated by ;. In a path a pad name is that pad's centre, name@x,y a point inside that pad or via, vN(x,y) a via of type N, cw(c..) or ccw(c..) an arc to the next point about the centre after c; other vN are vias at no path point)
+5: 
CHIP_PU: C6.2 C14.1 R5.1 SW2.2 U4.3 | length 72.1
  Top Layer w0.254: C6.2 22.55,37.02 R5.1 ; U4.3 v1(29.788,71.18)
  Bottom Layer w0.254: C6.2 15,44.57 15,57.592 15.259,57.851 21.177,52.241 28.569,52.241 29.788,53.461 ; v1(29.788,71.18) 29.788,53.461 ; SW2.2 32.277,48.937 C14.1 29.788,53.212 29.788,53.461
DTR: 
ESP_3V3: BU03.5 BU03.6 BU03.7 C1.2 C2.2 C20.1 D6.2 R5.2 R67.2 R76.2 U4.2 WIO-SX1262.8 | length 138.7
  Top Layer w0.254: C1.2 21.534,63.814 21.534,66.326 27.658,72.45 U4.2 ; C20.1 16.05,14.95 WIO-SX1262.8 14.78,11.275 14.7,11.195 14.7,8.35 14.903,8.147 23.017,8.147 25.95,11.08 R67.2 33.55,10.382 33.852,10.08 R76.2 ; v1(22.041,53.105) 22.041,42.86 v1(26.96,37.941) ; v1(25,19) 26,20 D6.2@26,22.13 ; v1(25.394,36.697) 24.355,36.697 24.05,36.392 R5.2 24.05,23.093 25.013,22.13 D6.2@26,22.13 ; D6.2 D6.2@26,22.13 ; v1(36.323,37.941) 38.024,39.643 42.512,39.643 43.177,38.978 ; BU03.7 41.698,37.703 41.698,38.627 42.049,38.978 43.177,38.978 ; BU03.6 42.725,38.549 43.606,38.549 ; BU03.5 44.125,38.03 43.606,38.549 ; 43.177,38.978 43.606,38.549
  Bottom Layer w0.254: C1.2 C2.2 15.049,60.097 v1(22.041,53.105) ; C20.1 20.722,19.45 21.172,19 v1@25.02,19 ; v1(25.394,36.697) 26.638,37.941 v1(26.96,37.941) v1(36.323,37.941)
GND: BU03.8 BU03.16 BU03.24 C1.1 C2.1 C6.1 C7.1 C8.1 C9.1 C10.1 C13.2 C14.2 C15.1 C20.2 C67.1 C420.2 C429.1 D5.2 D6.4 D7.C D8.1 D9.1 D10.1 J4.5 J67.1 J420.2 P67.1 R420.1 SW1.1 SW2.1 SW3.3 U2.1 U4.1 U4.40 U67.4 U67.8 WIO-SX1262.7 WIO-SX1262.10 | length 349.9
  Top Layer w0.254: v1(3.042,8.706) 3.042,7.033 3.88,6.195 WIO-SX1262.10 ; v1(4.55,71.13) D7.C 6.039,68.51 6.359,68.83 D8.1 D9.1 7.85,66.83 7.55,66.53 D10.1 ; U2.1 9.723,26.621 14.988,27.011 15.557,27.58 D5.2@16.687,27.58 ; C9.1 10.118,34.149 D5.2@16.687,27.58 ; C10.1 12.55,43.138 12.55,49.6 ; C15.1 10.17,57.45 v1(7.552,54.832) 12.008,54.832 12.55,54.29 R420.1 12.55,51.429 ; C8.1 D5.2@16.78,27.486 ; J420.2 10.585,50.83 10.382,50.627 10.382,49.371 12.321,49.371 12.55,49.6 ; WIO-SX1262.7 18.725,10.005 C20.2 26.417,17.697 ; D5.2 D5.2@17.015,27.58 ; C429.1 15.919,50.819 13.16,50.819 12.55,51.429 ; C1.1 23.82,73.72 U4.1 U4.40 ; v1(25.421,41.769) C6.1 ; D6.4 29.94,23.73 29.94,21.22 26.417,17.697 ; C67.1 37.55,7.83 41.638,11.699 41.638,12.821 ; C420.2 36.565,19.655 43.625,19.655 J67.1 48.584,16.73 49.725,17.871 BU03.24 ; BU03.16 39.237,25.93 39.925,26.618 BU03.8 v1(38.5,38.755) ; U67.4 38.724,13.33 37.814,12.42 38.424,11.699 40.516,11.699 41.638,12.821 ; U67.8 42.647,13.83 41.638,12.821 ; 12.55,49.6 12.55,51.429 ; D5.2@16.687,27.58 D5.2@16.78,27.486 ; D5.2@16.687,27.58 D5.2@16.874,27.58 ; D5.2@16.78,27.486 17,27.491 SW3.3 ; D5.2@16.78,27.486 D5.2@16.874,27.58 ; D5.2@16.874,27.58 17,27.58 D5.2@17.015,27.58 ; D5.2@17.015,27.58 SW3.3 ; D5.2@17.015,27.58 17.06,27.819 SW3.3 ; SW3.3 21,21.075 24.378,17.697 26.417,17.697
  Bottom Layer w0.254: v1(3.042,8.706) 3.046,8.706 C7.1 11.17,21.772 C8.1 ; P67.1 v1(7.552,54.832) ; v1(4.55,71.13) J4.5 ; C9.1 C10.1 ; C15.1 6.25,64.75 J4.5 ; C429.1 22.17,49.83 C14.2 25.55,46.768 SW2.1 ; C1.1 C2.1 15.049,73.102 13.633,74.517 6.521,74.517 6.217,74.212 6.217,72.863 J4.5 ; C20.2 30.905,11.83 ; v1(25.421,41.769) 25.421,43.345 SW2.1 ; C67.1 29.55,10.475 30.905,11.83 ; C420.2 34.74,15.665 30.905,11.83 ; C13.2 38.5,49.058 SW1.1 ; v1(38.5,38.755) SW1.1 ; SW2.1 31.862,40.456 33.835,40.456 SW1.1
GPIO0: C13.1 SW1.2 U4.27 | length 22.9
  Top Layer w0.254: C13.1 C13.1@45.55,49.82 ; v1(45.55,47.091) C13.1@45.55,49.82 ; U4.27 45.842,57.21 46.165,56.887 46.165,56.595 49,53.76 49,51 47.82,49.82 C13.1@45.55,49.82
  Bottom Layer w0.254: C13.1 43.58,48.042 SW1.2 v1(45.55,47.091)
GPIO1: R76.1 U4.39 U67.3 | length 80.5
  Top Layer w0.254: R76.1 36.55,12.821 37.559,13.83 U67.3 40.195,13.83 41.022,14.657 41.022,18.51 41.523,19.011 42.927,19.011 46.145,15.792 47.06,15.792 47.619,16.351 49.371,16.351 51.175,18.155 51.175,42.437 49.701,43.91 49.701,69.742 46.993,72.45 U4.39
GPIO2: U4.38 U67.5 | length 77.8
  Top Layer w0.254: U67.5 40.202,12.83 41.523,14.268 41.523,18.307 41.873,18.657 42.773,18.657 46.069,15.361 47.619,15.361 48.584,14.395 50.667,14.395 51.53,15.259 51.53,65.83 v1(50.895,66.465) ; U4.38 46.181,71.18 v1(47.542,69.818)
  Bottom Layer w0.254: v1(47.542,69.818) v1(50.895,66.465)
GPIO3: SW3.2 U4.15 | length 25.5
  Top Layer w0.254: U4.15 29.815,54.478 28.896,53.559 28.896,32.08 SW3.2
GPIO4: BU03.22 U4.4 | length 62.1
  Top Layer w0.254: U4.4 v1(38.525,69.91) ; BU03.22 46.925,25.919 v1(50.006,29)
  Bottom Layer w0.254: v1(38.525,69.91) 50.006,58.429 v1(50.006,29)
GPIO5: BU03.17 U4.5 | length 79.3
  Top Layer w0.254: v1(22.475,63.694) 22.523,63.742 22.523,66.186 24.977,68.64 U4.5 ; v1(34,35) 34,27.15 36.392,24.759 39.925,24.759 BU03.17
  Bottom Layer w0.254: v1(22.475,63.694) 22.427,63.646 14.751,63.646 14.222,63.117 14.222,38.775 18.997,34 33,34 v1(34,35)
GPIO6: U4.6 WIO-SX1262.1 | length 93
  Top Layer w0.254: v1(1.543,46.501) 1.543,31.236 1.01,30.702 1.01,16.986 8.757,9.239 8.757,3.198 9.569,2.385 WIO-SX1262.1 ; v1(25.013,67.354) 25.028,67.37 U4.6
  Bottom Layer w0.254: v1(1.543,46.501) 13.379,58.337 13.379,64.281 16.453,67.354 v1(25.013,67.354)
GPIO7: U4.7 WIO-SX1262.5 | length 99.2
  Top Layer w0.254: WIO-SX1262.5 10.382,7.465 9.315,8.532 9.315,13.557 6.648,16.224 6.648,27.045 7.106,27.502 12.309,27.502 13.227,28.42 13.227,29.966 9.29,33.903 9.29,35.985 9.544,36.239 12.821,36.239 13.837,35.223 13.837,30.931 14.91,29.858 17.765,29.858 18,30.093 18,42.841 20.354,45.195 20.354,59.354 24.138,63.138 24.138,63.357 24.505,63.724 24.505,65.653 24.952,66.1 U4.7
GPIO8: R67.1 U4.12 U67.2 | length 63
  Top Layer w0.254: U4.12 27.248,59.75 26.705,60.293 24.293,60.293 24.047,60.047 24.047,45.637 28.188,41.497 v1(28.188,25.394) ; v1(32.074,14.319) 32.085,14.33 34.766,14.33 ; R67.1 33.55,13.114 34.766,14.33 ; U67.2 34.766,14.33
  Bottom Layer w0.254: v1(28.188,25.394) 32.074,21.507 v1(32.074,14.319)
GPIO9: U4.17 WIO-SX1262.6 | length 58.5
  Top Layer w0.254: WIO-SX1262.6 21.435,8.735 33,20.3 33,44.215 33.074,44.29 cw(c33.254,44.11) 33.076,44.291 ccw(c32.277,45.121) 33.08,45.947 33.075,45.952 cw(c33.254,46.132) 33.074,45.953 33,46.027 33,48.868 32.926,48.942 32.865,49.003 32.827,49.003 32.343,49.487 32.343,50.173 32.827,50.657 32.865,50.657 32.926,50.718 33,50.792 33,52.088 32.926,52.162 32.355,52.733 U4.17
GPIO10: BU03.3 U4.18 | length 25.6
  Top Layer w0.254: U4.18 33.625,52.57 41.65,44.545 41.65,42.081 42.64,41.091 45.147,41.091 46.925,39.313 BU03.3
GPIO11: BU03.18 U4.19 WIO-SX1262.3 | length 82.6
  Top Layer w0.254: WIO-SX1262.3 22.629,4.925 v1(24.454,6.75) ; U4.19 34.895,54.246 42.081,47.06 42.081,43.174 42.894,42.361 49.397,42.361 50.463,41.294 50.463,34.766 41.325,25.628 BU03.18 41.325,22.513 v1(40.243,21.431)
  Bottom Layer w0.254: v1(24.454,6.75) 29.889,6.75 30.804,7.664 30.804,10.865 40.243,20.304 v1(40.243,21.431)
GPIO12: BU03.20 U4.20 WIO-SX1262.4 | length 101.5
  Top Layer w0.254: WIO-SX1262.4 v1(21.25,6.195) ; U4.20 36.165,54.678 v1(36.519,54.324) ; BU03.20 44.125,22.875 45,22 v1(46,22)
  Bottom Layer w0.254: v1(21.25,6.195) 22.549,4.896 30.702,4.896 31.82,6.013 31.82,11.017 41.142,20.339 41.142,20.949 42.193,22 43.545,22 44.545,20.999 ; v1(36.519,54.324) 40.006,50.837 40.006,34.911 51.454,23.463 51.454,15.665 51.022,15.234 50.311,15.234 44.545,20.999 ; v1(46,22) 45.758,22 45.161,21.402 44.948,21.402 44.545,20.999
GPIO13: BU03.19 U4.21 WIO-SX1262.2 | length 87.7
  Top Layer w0.254: WIO-SX1262.2 16.793,2.912 17.244,2.912 17.377,2.779 17.377,2.328 17.705,2 19.226,2 v1(20.184,2.958) ; U4.21 37.435,52.978 47.036,43.377 48.948,43.377 50.819,41.506 50.819,33.716 42.725,25.622 BU03.19 v1(42.725,20.914)
  Bottom Layer w0.254: v1(20.184,2.958) 36.997,2.958 37.146,3.107 37.146,15.335 v1(42.725,20.914)
GPIO14: U4.22 WIO-SX1262.11 | length 93.8
  Top Layer w0.254: v1(2.178,4.925) WIO-SX1262.11 ; v1(38.705,53.842) U4.22
  Bottom Layer w0.254: v1(2.178,4.925) 2.178,29.851 2.327,30 33.067,30 39.652,36.585 39.652,49.108 35.655,53.105 35.655,54.68 36.213,55.237 37.309,55.237 v1(38.705,53.842)
GPIO15: U4.8 WIO-SX1262.12 | length 85.7
  Top Layer w0.254: v1(0.654,44.311) 0.654,4.62 1.619,3.655 WIO-SX1262.12 ; v1(25,63) 26.83,64.83 U4.8
  Bottom Layer w0.254: v1(0.654,44.311) 13.868,57.525 13.868,63.717 15.151,65 23,65 v1(25,63)
GPIO19: D10.2 J4.3 U4.13 | length 40.6
  Top Layer w0.254: D10.2 v1(12.303,64.83) ; v1(26.333,59.43) 27.283,58.48 U4.13
  Bottom Layer w0.254: J4.3 7.55,68.83 10.423,65.957 13.43,65.957 ; v1(12.303,64.83) 13.43,65.957 ; v1(26.333,59.43) 26.333,67.278 25.063,68.548 16.021,68.548 13.43,65.957
GPIO20: D9.2 J4.2 U4.14 | length 49.8
  Top Layer w0.254: D9.2 v1(11.55,66.83) ; v1(26.432,57.572) 26.794,57.21 U4.14
  Bottom Layer w0.254: J4.2 9.025,73.83 10.319,72.391 ; 11.022,67.859 11.022,67.794 11.55,67.266 13.675,68.955 ; v1(11.55,66.83) 13.675,68.955 ; v1(26.432,57.572) 27.197,58.337 27.197,68.091 26.333,68.955 13.675,68.955 ; 10.319,72.392 10.646,71.91 ; 10.319,72.391 10.646,71.91 ; 10.319,72.391 10.55,71.83 11.022,71.358 ; 10.646,71.91 10.654,71.9 11.022,71.358 ; 10.646,71.91 11.022,71.358 ; 11.022,71.358 13.425,68.955 ; 11.022,71.358 11.022,69.94 12.008,68.955 13.425,68.955 ; 13.425,68.955 13.675,68.955
GPIO38: D6.1 U4.31 | length 58.3
  Top Layer w0.254: D6.1 26.029,23.68 26.029,24.327 26.232,24.53 28.975,24.53 29.458,25.013 29.458,25.825 28.823,26.46 28.823,31.409 28.542,31.69 28.542,56.177 29.077,56.712 29.077,61.477 29.889,62.29 U4.31
GPIO41: U4.33 U4.34 | length 1.3
  Top Layer w0.254: U4.33 U4.34
NetC3_2: 
NetC9_2: C9.2 C10.2 R11.2 U2.2 U2.4 | length 31.2
  Top Layer w0.254: C9.2 2.498,28.932 U2.4 U2.2 ; C10.2 5.624,37.58 R11.2
  Bottom Layer w0.254: C9.2 C10.2
NetC12_2: 
NetC15_2: 
NetC21_2: 
NetC67_2: C67.2 U67.1 | length 10.4
  Top Layer w0.254: C67.2 39.251,15.45 39.4,15.301 U67.1
NetC420_1: C420.1 J67.2 U67.10 | length 7.1
  Top Layer w0.254: C420.1 45.36,14.83 ; U67.10 45.36,14.83 ; J67.2 45.36,14.83
NetD5_1: D5.1 R11.1 | length 6.1
  Top Layer w0.254: R11.1 14.55,33.45 D5.1
NetD420_2: D420.2 RLED.1 | length 4.5
  Top Layer w0.254: RLED.1 7.8,47.83 D420.2
NetJ420_1: J420.1 RLED.2 | length 6.1
  Top Layer w0.254: RLED.2 7.55,51.621 7.699,51.77 J420.1
NetJ420_3: J420.3 P67.2 | length 12
  Top Layer w0.254: P67.2 4.939,50.949 5.208,50.949 7.008,52.749 11.652,52.749 12.16,52.241 12.16,49.89 J420.3
NetJ420_5: J420.5 R420.2 | length 2.2
  Top Layer w0.254: J420.5 13.898,51.77 14.05,51.922 R420.2
NetP?_1: P?.1 U67.7 | length 6.2
  Top Layer w0.254: U67.7 43.025,13.33 42.738,13.044 42.738,12.616 42.892,12.463 43.647,12.463 P?.1
NetP?_2: P?.2 U67.9 | length 6.5
  Top Layer w0.254: U67.9 44.376,14.33 47.55,11.156 P?.2
NetQ1_1: 
NetQ2_1: 
NetR14_2: 
NetR16_2: 
RTS: 
U0RXD: U4.36
U0TXD: U4.37
USB_DN: 
USB_DP: 
VCC_5V: C7.2 C8.2 C15.2 C429.2 D7.A D8.2 D420.1 J4.1 J67.3 J420.4 U2.3 | length 157.5
  Top Layer w0.254: D7.A 4.55,62.83 C15.2 4.366,60.83 8.376,64.84 8.376,67.13 9.21,67.964 D8.2 ; J4.1 8.85,69.15 9.17,68.83 D8.2 ; v1(12.008,29) 9.878,31.13 U2.3 8.373,31.13 8,31.503 8,36.7 15.234,36.849 15.234,43.896 D420.1 15.3,45.83 C429.2 19.813,47.093 19.813,51.022 ; J420.4 18.681,49.89 19.813,51.022 ; J67.3 50.032,15.78 v1(50.514,16.263) ; D8.2 12.792,68.83 19.813,61.81 19.813,51.022
  Bottom Layer w0.254: C7.2 3.55,21.772 C8.2 8.388,26.714 ; v1(12.008,29) 10.674,29 8.388,26.714 ; v1(50.514,16.263) 50.514,23.768 47.568,26.714 8.388,26.714
pads on no net: BU03.1 BU03.2 BU03.4 BU03.9 BU03.10 BU03.11 BU03.12 BU03.13 BU03.14 BU03.15 BU03.21 BU03.23 D6.3 J4. J4.4 J4.6 J4.7 SW3.1 SW3.4 U4.9 U4.10 U4.11 U4.16 U4.23 U4.24 U4.25 U4.26 U4.28 U4.29 U4.30 U4.32 U4.35 U4.41_1 U4.41_2 U4.41_3 U4.41_4 U4.41_5 U4.41_6 U4.41_7 U4.41_8 U4.41_9 U4.41_10 U4.41_11 U4.41_12 U4.41_13 U4.41_14 U4.41_15 U4.41_16 U4.41_17 U4.41_18 U4.41_19 U4.41_20 U4.41_21 U67.6 WIO-SX1262.9

## Polygon pours and split planes (outlines as drawn)
GND on GND "GND_L02_P000" (solid, pour order 0): 0,75 52,75 52,0 0,0
ESP_3V3 on PWR "ESP_3V3_L03_P001" (solid, pour order 1): 0,75 52,75 52,0 0,0
GND on Top Layer "GND_L01_P002" (solid, pour order 2): 0,75 52,75 52,0 0,0
GND on Bottom Layer "GND_L04_P003" (solid, pour order 3): 0,75 52,75 52,0 0,0

## Text inside footprints (layer, text, board x,y; h text height)
U4: Mechanical 13 "ANTENNA" at 32.3,77.96 h1.27